# Altium PCB Nano_RP2040_Connect.PcbDoc (part 1 of 2)
Units mm, origin at the board's own origin, x right, y up, seen from the top; angles counter-clockwise.
Board outline 43.18 x 17.78 mm, 4 copper layers (TOP, GND, SIG, BOTTOM), stack 1.586 mm thick; 92 components, 78 nets, 388 pads, 198 vias.
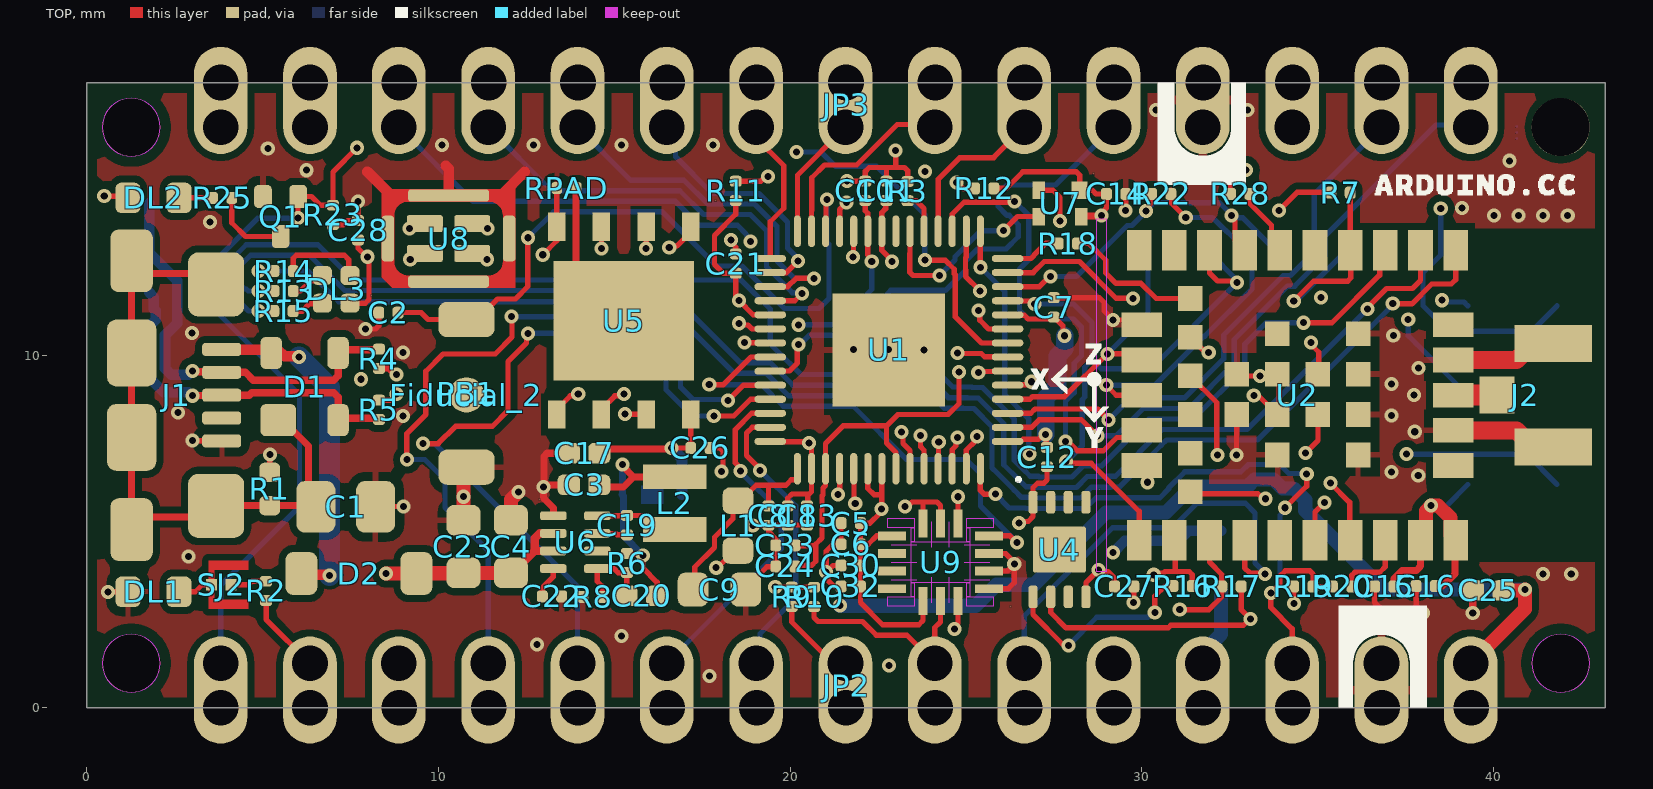
[diagram p0: TOP view]
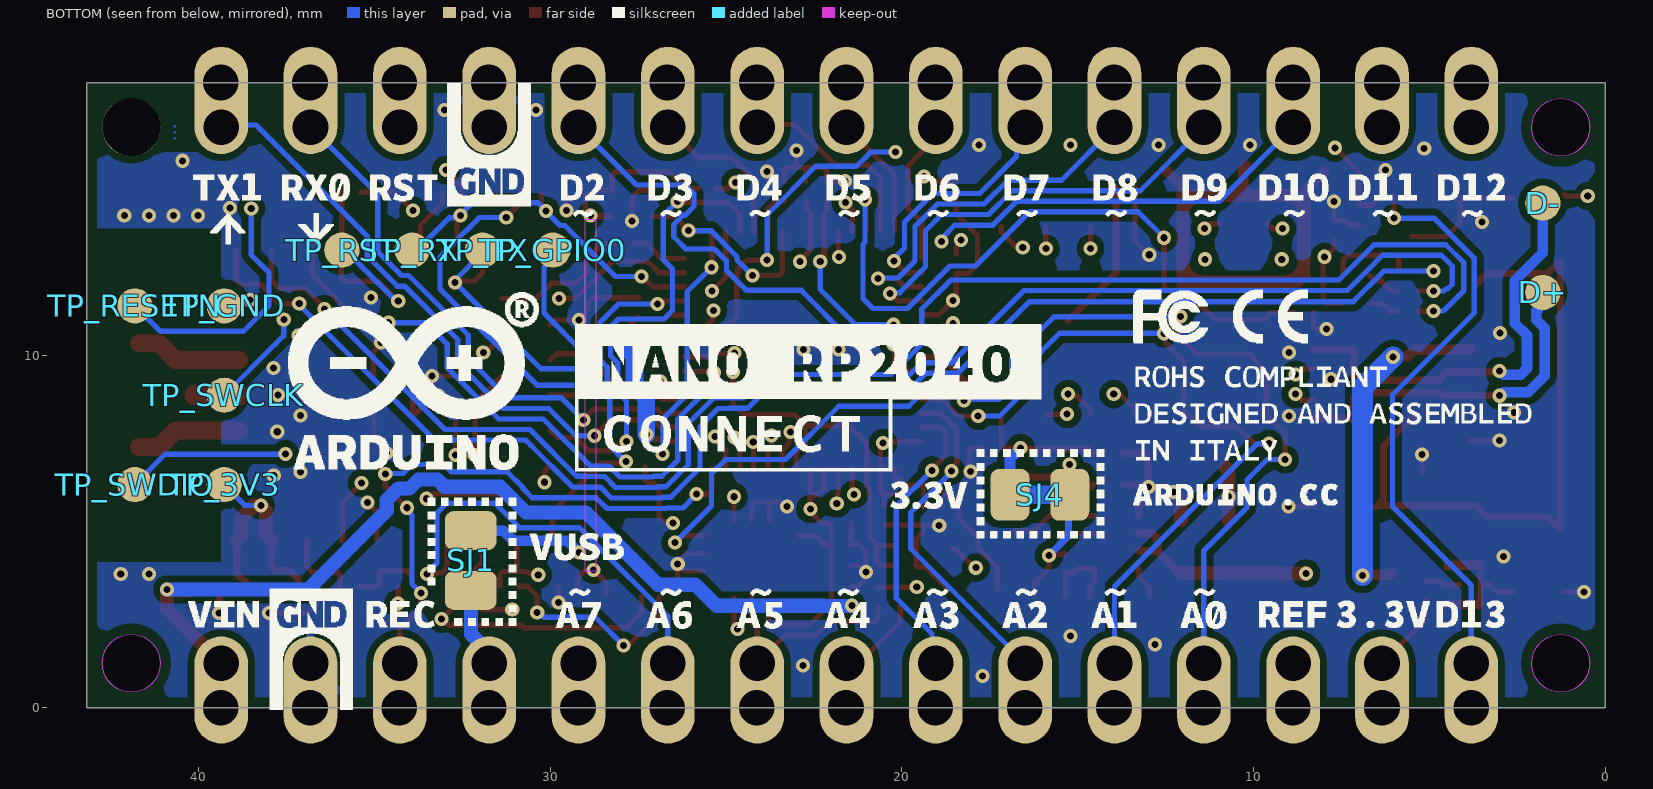
[diagram p1: BOTTOM view, seen from below]
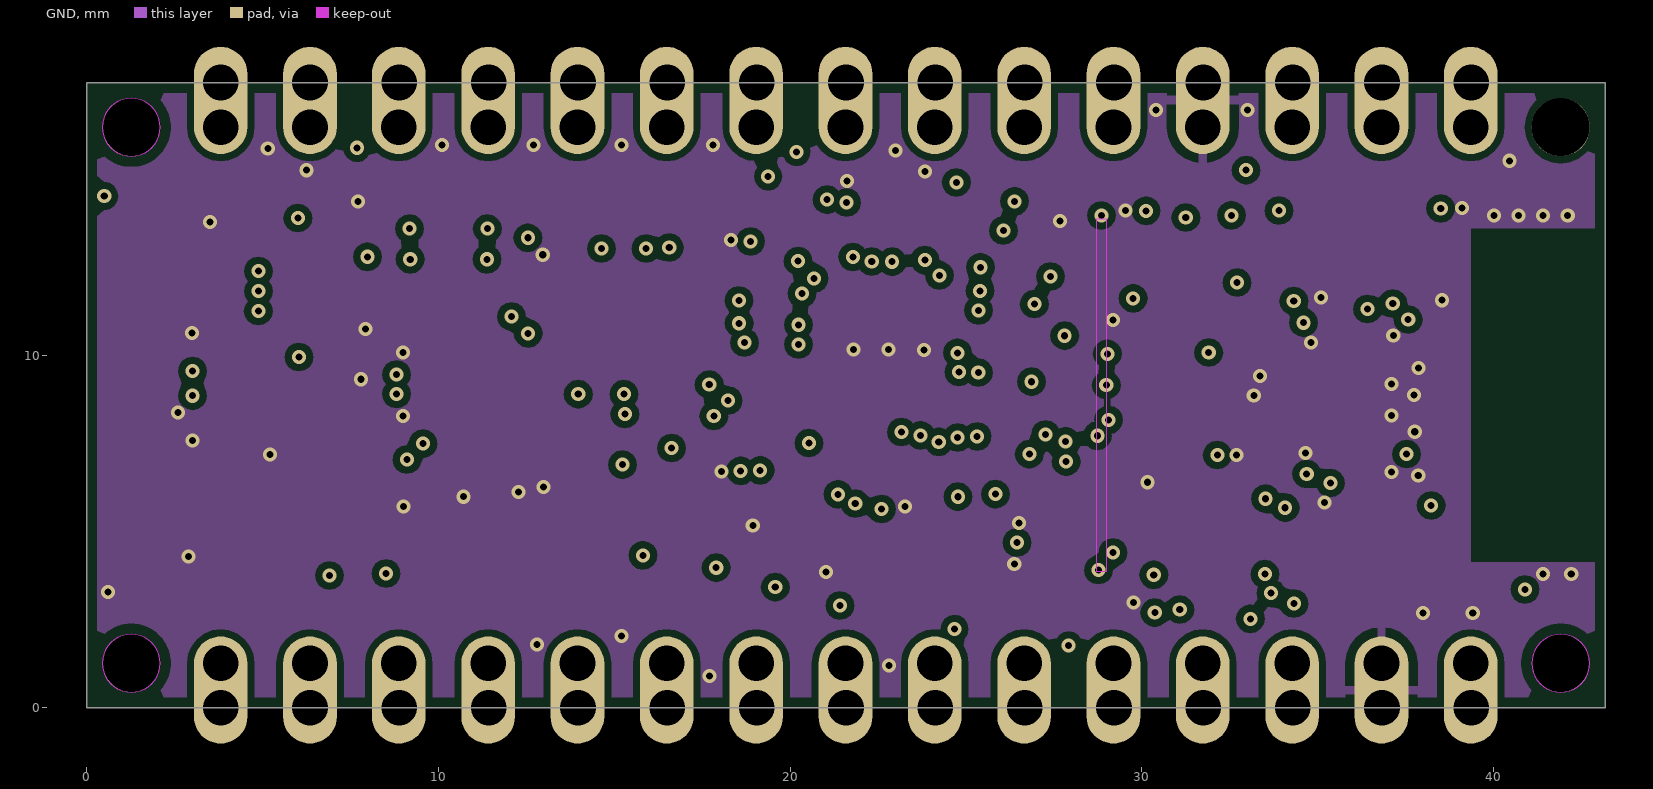
[diagram p2: GND]
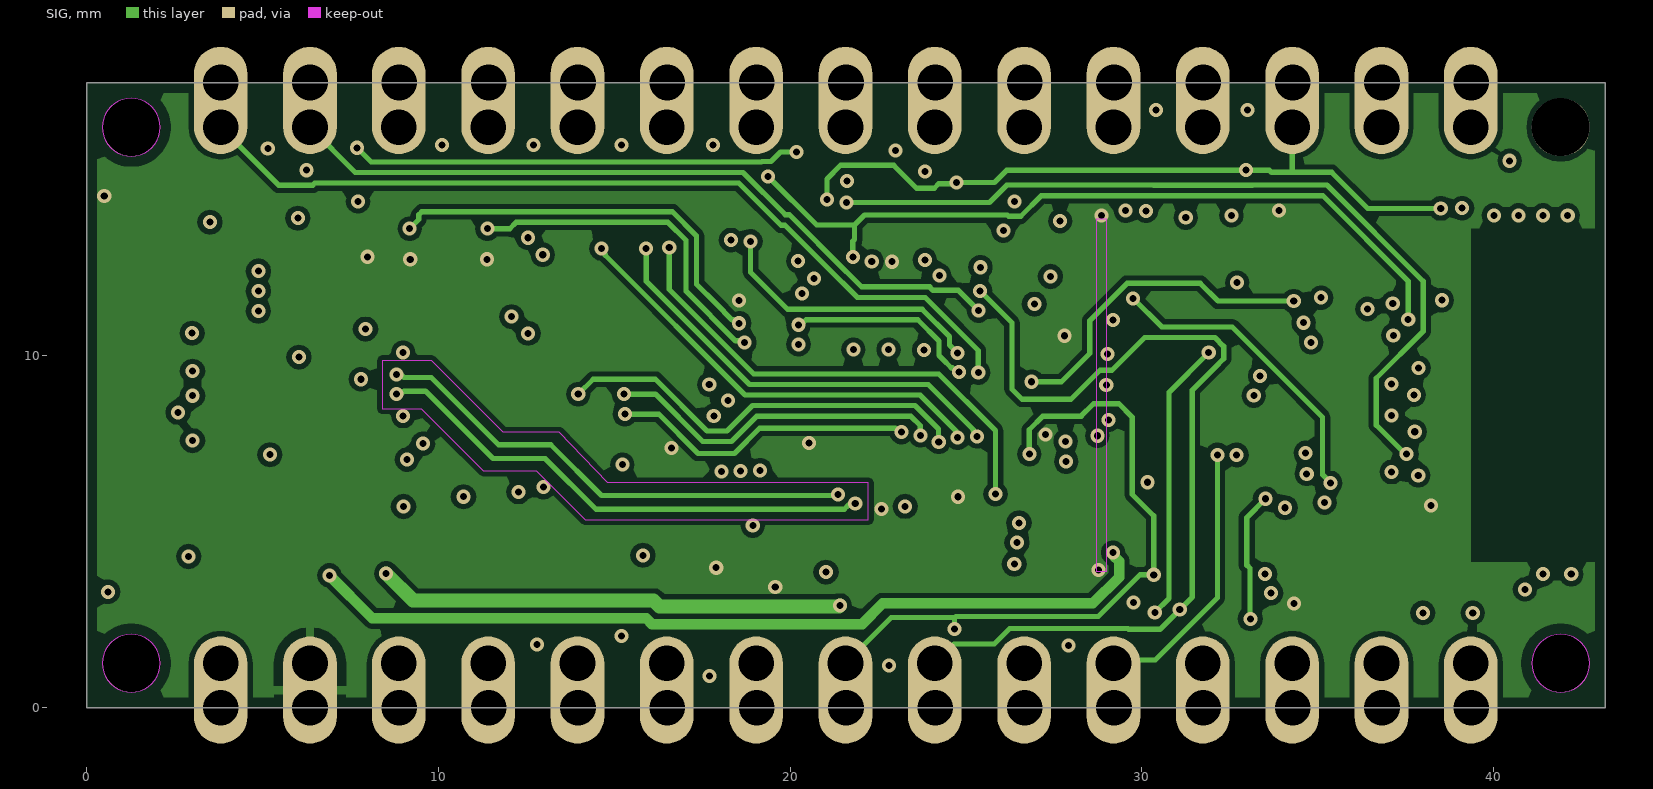
[diagram p3: SIG]
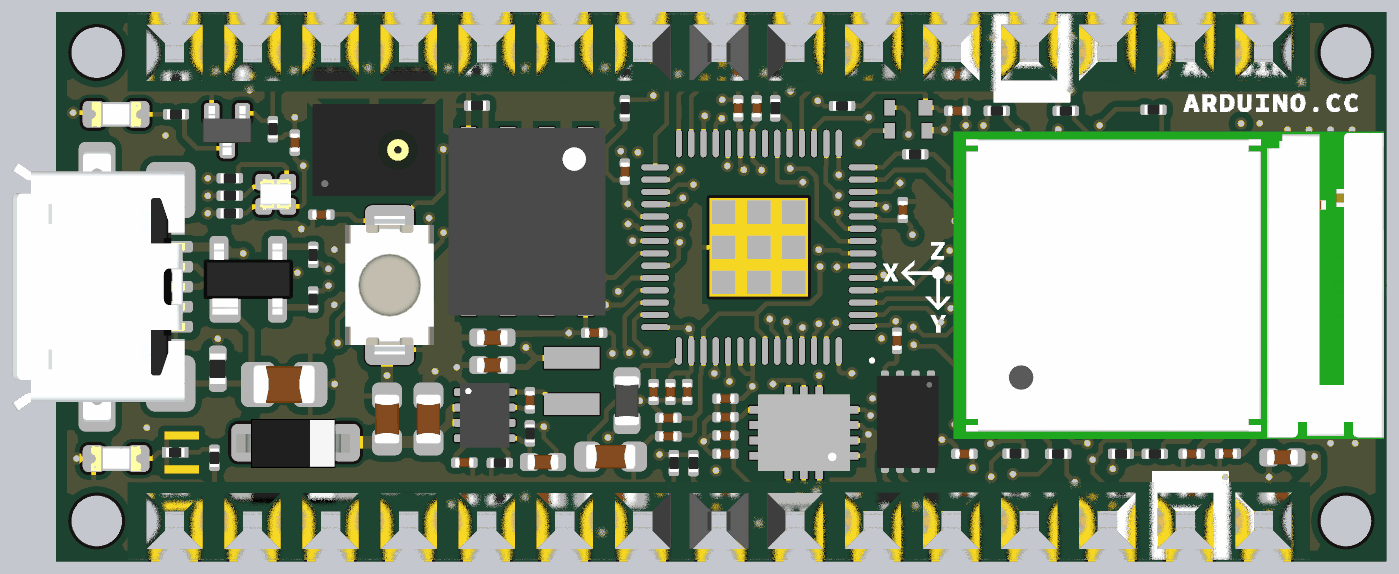
[diagram p5: 3D render of the assembled board from above, using the file's embedded part models]

## Layer stack, top to bottom
Top Solder: solder mask 0.0102, Solder Resist, Dk 3.5
TOP: signal copper 0.018
Dielectric 1: prepreg 0.14, PP-014, Dk 4.2
GND: signal copper 0.035
Dielectric2: core 1.2, FR-4, Dk 4.8
SIG: signal copper 0.035
Dielectric3: prepreg 0.14, PP-014, Dk 4.2
BOTTOM: signal copper 0.018
Bottom Solder: solder mask 0.0102, Solder Resist, Dk 3.5

## Board outline
43.174,-0.009 -0.006,-0.009 -0.006,17.771 43.174,17.771
cut-out: 41.904,0.436 ccw(c41.904,1.261) 42.73,1.261 ccw(c41.904,1.261) 41.904,2.087 ccw(c41.904,1.261) 41.079,1.261 ccw(c41.904,1.261)
cut-out: 1.264,15.676 ccw(c1.264,16.501) 2.09,16.501 ccw(c1.264,16.501) 1.264,17.327 ccw(c1.264,16.501) 0.439,16.501 ccw(c1.264,16.501)
cut-out: 1.264,0.436 ccw(c1.264,1.261) 2.09,1.261 ccw(c1.264,1.261) 1.264,2.087 ccw(c1.264,1.261) 0.439,1.261 ccw(c1.264,1.261)

## Design rules (kind name [scope] priority, off if disabled: settings)
BoardOutlineClearance Silks [(OnLayer('Top Overlay') OR OnLayer('Bottom Overlay'))] p1: gap=0.01 ignorepadtopadclearanceinfootprint=FALSE
BoardOutlineClearance MountingHoles [(ObjectKind = 'Pad') And (Name = 'Free-MH')] p2: gap=0 ignorepadtopadclearanceinfootprint=FALSE
BoardOutlineClearance Header_Castellated [((ObjectKind = 'Pad') And (Component = 'JP2')) OR                                                                                    ((ObjectKind = 'Pad') And (Component = 'JP3'))] p3: gap=0 ignorepadtopadclearanceinfootprint=FALSE
BoardOutlineClearance [All] p4: gap=0.3 ignorepadtopadclearanceinfootprint=FALSE
Clearance GND_POLYGONS [(InNamedPolygon('GND_TOP') OR InNamedPolygon('GND_2') OR InNamedPolygon('GND_3') OR InNamedPolygon('GND_BOT'))] p1: gap=0.2 ignorepadtopadclearanceinfootprint=FALSE
Clearance "Generic clearance 0.15mm" [All] p2: gap=0.15 ignorepadtopadclearanceinfootprint=FALSE
ComponentClearance NINA-UFL [InComponent('U2') vs InComponent('J2')] p1: gap=0 collisioncheckmode=3 verticalgap=0 showdistances=FALSE
ComponentClearance [All] p2: gap=0 collisioncheckmode=3 verticalgap=0 showdistances=FALSE
DiffPairsRouting [InDifferentialPairClass('USB')] p1: maxlimit=0.254 minlimit=0.15 mostfreqgap=0.254 toplayer_maxgap=0.15 toplayer_prefgap=0.15 toplayer_minwidth=0.15 toplayer_maxwidth=0.21 toplayer_prefwidth=0.21 midlayer14_mingap=0.24 midlayer14_maxgap=0.24 midlayer14_prefgap=0.24 midlayer14_minwidth=0.15 midlayer14_maxwidth=0.15 midlayer14_prefwidth=0.15 bottomlayer_maxgap=0.15 bottomlayer_prefgap=0.15 bottomlayer_minwidth=0.21 bottomlayer_maxwidth=0.21 bottomlayer_prefwidth=0.21 impedanceprofiledriven=TRUE impedanceprofileid={C5D8398E-BCA5-4495-8332-5063613C51E1} impedanceprofilevalue=90.000000 maxuncoupledlength=12.7
HoleSize [All] p1: absolutevalues=TRUE maxlimit=6 minlimit=0.2 maxpercent=80.000 minpercent=20.000
HoleToHoleClearance [All] p1: gap=0.25 allowstackedmicrovias=TRUE
MinimumAnnularRing [All] p1: minimumring=0.1
MinimumSolderMaskSliver [All] p1: minsoldermaskwidth=0.1
NetAntennae Inductor [(ObjectKind = 'Component') And (Comment = 'MAKK2016T3R3M')] p1: netantennaetolerance=10
NetAntennae [All] p2: netantennaetolerance=0
PolygonConnect [All] p1: thpad.connectstyle=Relief thpad.reliefconductorwidth=0.254 thpad.reliefentries=4 thpad.polygonreliefangle="90 Angle" thpad.airgapwidth=0.254 smdpad.connectstyle=Relief smdpad.reliefconductorwidth=0.15 smdpad.reliefentries=4 smdpad.polygonreliefangle="90 Angle" smdpad.airgapwidth=0.254 via.connectstyle=Direct via.reliefconductorwidth=0.254 via.reliefentries=4 via.polygonreliefangle="90 Angle" via.airgapwidth=0.254
RoomDefinition TOP [InComponentClass('TOP')] p1: confinementstyle=ConfineIn formatcopy=TRUE lockcomponents=FALSE outline -0.006,-0.009 43.174,-0.009 43.174,17.771 -0.006,17.771
RoutingVias [All] p1: holewidth=0.2 width=0.4 viastyle="Through Hole" minholewidth=0.2 minwidth=0.4 maxholewidth=0.2 maxwidth=0.4
ShortCircuit SJ4 [Component = 'SJ4' vs (InNet('+3V3') OR InNet('NetC3_2'))] p1: allowed=TRUE
ShortCircuit [All] p2: allowed=FALSE
SilkToSilkClearance [All] p1: silktosilkclearance=0.2
SilkToSolderMaskClearance [IsPad] p1: minsilkscreentomaskgap=0.1 clearancetoexposedcopper=TRUE
SolderMaskExpansion Solder_VIA [IsVia] p1: expansion=0.102 istentingtop=TRUE
SolderMaskExpansion [All] p2: expansion=0.102 istentingtop=FALSE
UnRoutedNet [All] p1: checkbadconnections=TRUE
ViasUnderSMD [All] p1: allowed=FALSE
Width [All] p1: maxlimit=5 minlimit=0.15 preferedwidth=0.15
20 further rules are at their usual default settings.

## Classes and differential pairs
net class 50ohm: ANT
differential pair class USB: D USB
pad class SMDPaste_OFF: D+-X D--X FD1-P$1 J3-4
differential pair USB: +USB_P -USB_N
differential pair D: +D_P -D_N

## Components (designator, comment, footprint, x,y, rotation, side; value= is the part's Value field where it differs from the comment)
C1 "C0805C472KDRACTU" CAP-0805 7.36,5.706 r180 top value=4.7nF
C2 "CL03A104KP3NNNC" CAP-0201 8.573,11.226 r180 top value=100nF
C3 "GRM155R60J106ME05D" CAP-0402 14.136,6.331 r0 top value=10µF
C4 "GRM188R61E106MA73J" CAP-0603 12.058,4.578 r270 top value=10µF
C5 "CL03A104KP3NNNC" CAP-0201 21.72,5.243 r180 top value=100nF
C6 "CL03A104KP3NNNC" CAP-0201 21.72,4.643 r180 top value=100nF
C7 "CL03A104KP3NNNC" CAP-0201 27.491,11.379 r90 top value=100nF
C8 "CL03A104KP3NNNC" CAP-0201 19.38,5.457 r270 top value=100nF
C9 "CC0603MRX5R5BB106" CAP-0603 17.985,3.355 r180 top value=10µF
C10 "CL03A104KP3NNNC" CAP-0201 22.134,14.691 r90 top value=100nF
C11 "CL03A104KP3NNNC" CAP-0201 22.734,14.691 r90 top value=100nF
C12 "CL03A104KP3NNNC" CAP-0201 27.299,7.122 r270 top value=100nF
C13 "GRM033R60J105MEA2D" CAP-0201 20.476,5.457 r270 top value=1µF
C14 "CL03A104KP3NNNC" CAP-0201 29.264,14.602 r0 top value=100nF
C15 "CL03A104KP3NNNC" CAP-0201 36.888,3.442 r180 top value=100nF
C16 "CL03A104KP3NNNC" CAP-0201 38.069,3.453 r180 top value=100nF
C17 "GRM155R60J106ME05D" CAP-0402 14.136,7.231 r0 top value=10µF
C18 "CL03A104KP3NNNC" CAP-0201 19.928,5.457 r270 top value=100nF
C19 "CL03A104KP3NNNC" CAP-0201 15.358,5.186 r270 top value=100nF
C20 "C0402C220J5GAC7411" CAP-0402 15.78,3.176 r0 top value=22pF
C21 "CL03A104KP3NNNC" CAP-0201 18.45,12.625 r90 top value=100nF
C22 "GRM033R60J105MEA2D" CAP-0201 13.225,3.16 r180 top value=1µF
C23 "GRM188R61E106MA73J" CAP-0603 10.708,4.578 r270 top value=10µF
C24 "CL03A104KP3NNNC" CAP-0201 19.862,4.014 r180 top value=100nF
C25 "C0402C105K8PACTU" CAP-0402 39.839,3.33 r0 top value=1µF
C26 "CL03A104KP3NNNC" CAP-0201 17.446,7.381 r0 top value=100nF
C27 "CL03A104KP3NNNC" CAP-0201 29.494,3.442 r0 top value=100nF
C28 "CL03A104KP3NNNC" CAP-0201 7.711,13.571 r90 top value=100nF
C30 "CL03A104KP3NNNC" CAP-0201 21.72,4.043 r180 top value=100nF
C32 "CL03A104KP3NNNC" CAP-0201 21.72,3.443 r180 top value=100nF
C33 "GRM033R60J105MEA2D" CAP-0201 19.862,4.614 r0 top value=1µF
D1 "PRTR5V0U2X,215" SOT190P230X110-4N 6.192,9.126 r0 top
D2 "D0026-A.2" SOD123-1 7.734,3.811 r180 top
D+ "CMP-018-0005-A.3" TP-1.00MM#1 1.772,11.802 r0 top
D- "CMP-018-0005-A.3" TP-1.00MM#1 1.772,14.342 r0 top
DL1 "HSMG-C190" LEDC1608X80N-AK 1.894,3.291 r0 top
DL2 "HSMD-C190" LEDC1608X80N-AK 1.894,14.491 r180 top
DL3 "SMLP34RGB2W3" SMLP34RGB2W 7.089,11.891 r90 top
Fiducial_2 "Fiducial mark 1mm with 2mm solder" "Fiducial mark 1mm with circle-Footprint-1" 10.794,8.891 r90 top
J1 "ZX62-AB-5PA(31)" ZX62-AB-5PA 1.274,8.881 r270 top
J2 "U.FL-R-SMT-1(60)" U.FL-R-SMT-1(60)-1 41.694,8.881 r270 top
JP2 "PINHD-1X15-NANO" PINHD-1X14_5VF#1 3.804,1.261 r180 top locked
JP3 "PINHD-1X15-NANO-DIGITAL-CASTELLATED" PINHD-1X14_5VF#2 39.364,16.501 r0 top locked
L1 "BLM18PG471SN1D" L-0603 18.514,5.173 r270 top
L2 "MAKK2016T3R3M" MAKK2016T3R3M-Footprint-1 16.718,5.814 r90 top
PB1 "IT-1185AP1C-160G-GTR" C&K_PTS820_NO_HOLES-1 10.794,8.933 r90 top
Q1 "2N7002T-7-F" SOT523 5.508,13.961 r180 top
R1 "CRCW04021M00FKED" RES-0402 5.201,6.214 r270 top value=1M
R2 "AC0201FR-07330RL" RES-0201 5.094,3.316 r270 top value=330
R3 "CRCW02010000Z0ED" RES-0201 23.338,14.687 r90 top value=0
R4 "CRCW020127R0FNED" RES-0201 8.304,9.916 r270 top value=27R
R5 "CRCW020127R0FNED" RES-0201 8.304,8.466 r90 top value=27R
R6 "RMCF0201FT976K" RES-0201 15.358,4.109 r90 top value=976k
R7 "AC0201FR-07220KL" RES-0201 35.644,14.639 r180 top value=220k
R8 "AC0201FR-07220KL" RES-0201 14.377,3.149 r0 top value=220k
R9 "RC0201FR-074K7L" RES-0201 20.043,3.147 r90 top value=4.7k
R10 "RC0201FR-074K7L" RES-0201 20.676,3.146 r90 top value=4.7k
R11 "RC0201FR-074K7L" RES-0201 18.45,14.691 r270 top value=4.7k
R12 "RC0201FR-074K7L" RES-0201 25.513,14.762 r0 top value=4.7k
R13 "AC0201FR-07330RL" RES-0201 5.594,11.841 r180 top value=330
R14 "AC0201FR-07330RL" RES-0201 5.594,12.412 r180 top value=330
R15 "AC0201FR-07330RL" RES-0201 5.591,11.271 r180 top value=330
R16 "CRCW02010000Z0ED" RES-0201 31.155,3.453 r180 top value=0
R17 "CRCW02010000Z0ED" RES-0201 32.544,3.442 r0 top value=0
R18 "CRCW02010000Z0ED" RES-0201 27.894,13.191 r0 top value=0
R19 "RC0201FR-074K7L" RES-0201 34.588,3.442 r180 top value=4.7k
R20 "CRCW02010000Z0ED" RES-0201 35.688,3.442 r180 top value=0
R22 "CRCW02010000Z0ED" RES-0201 30.546,14.602 r180 top value=0
R23 "RMCF0201FT976K" RES-0201 6.996,14.006 r90 top value=976k
R25 "AC0201FR-07330RL" RES-0201 3.844,14.491 r0 top value=330
R28 "CRCW02010000Z0ED" RES-0201 32.794,14.602 r180 top value=0
RPAD "CRCW02010000Z0ED" RES-0201 13.636,14.771 r180 top value=0
SJ1 "SMD solder JUMPER 0805" SJ#1 32.252,4.182 r270 bottom
SJ2 "Solder Jumper 0201 CLOSED with HUG" "Solder Jumper Maze-Footprint-1" 3.819,3.491 r270 top
SJ4 "SMD solder JUMPER CLOSED" SJ#2 16.071,6.052 r180 bottom
TP_3V3 "CMP-018-0005-A.3" TP-1.00MM#2 39.263,6.341 r90 bottom
TP_GND "CMP-018-0005-A.3" TP-1.00MM#2 39.263,11.421 r90 bottom
TP_GPIO0 "CMP-018-0005-A.3" TP-1.00MM#2 29.919,13.006 r90 bottom
TP_RESETN "CMP-018-0005-A.3" TP-1.00MM#2 41.803,11.421 r90 bottom
TP_RST "CMP-018-0005-A.3" TP-1.00MM#2 35.919,13.006 r90 bottom
TP_RX "CMP-018-0005-A.3" TP-1.00MM#2 33.919,13.006 r90 bottom
TP_SWCLK "CMP-018-0005-A.3" TP-1.00MM#2 39.263,8.881 r90 bottom
TP_SWDIO "CMP-018-0005-A.3" TP-1.00MM#2 41.803,6.341 r90 bottom
TP_TX "CMP-018-0005-A.3" TP-1.00MM#2 31.919,13.006 r90 bottom
U1 "RP2040" QFN40P700X700X90_HS-57N 22.804,10.166 r180 top locked
U2 "NINA-W102-00B" NINA-W102 34.869,8.881 r180 top locked
U4 "ATECC608A-MAHDA-T" UDFN8 27.654,4.491 r180 top
U5 "AT25SF128A-MHB-T" PSON127P600X60_HS-9N 15.266,11.001 r270 top
U6 "MP2322GQH" QFN50P150X200X90-8L 13.888,4.701 r0 top
U7 "DSC6111HI2B-012.0000" DFN120P120X89-4M 27.672,14.333 r180 top
U8 "MP34DT06JTR" HCLGA 10.284,13.334 r0 top
U9 "LSM6DSOXTR" VFLGA14 24.271,4.131 r180 top

## Footprints (in the part's own frame and the unit in brackets; to place one, negate y for a bottom-side part, rotate by r counter-clockwise, add the part's x,y. Pads: shape width x height; smd on the part's side, far side on the other; paste and mask are expansions set on the pad)
C&K_PTS820_NO_HOLES-1 [mm]
  rrect49% 1x1.6 smd mask+0.05: 1(-2.1,0) 2(2.1,0)
  body extent -2.25,-1.45 2.25,1.45, height 2
CAP-0201 [mm] "Chip Capacitor, 2-Leads, Body 0201 (in) 0603 (mm) IPC Medium Density"
  rrect52% 0.31x0.34 smd mask+0: 1(-0.275,0) 2(0.275,0)
  body extent -0.3,-0.15 0.3,0.15, height 0.3
CAP-0402 [mm] "Chip Capacitor, 2-Leads, Body  0402 (in) 1005 (mm), IPC Medium Density"
  rrect52% 0.63x0.58 smd mask+0: 1(-0.435,0) 2(0.435,0)
  body extent -0.5,-0.25 0.5,0.25, height 0.5
CAP-0603 [mm] "Chip Capacitor, Body 0603 imperial,1.6x0.8mm, IPC High Density"
  rrect51% 0.87x0.97 smd mask+0: 1(-0.75,0) 2(0.75,0)
  body extent -0.8,-0.4 0.8,0.4, height 0.8
CAP-0805 [mm] "Chip Capacitor, Body 0805 imperial, 2.0x1.2mm, IPC Medium Density"
  rrect45% 1.11x1.47 smd mask+0: 1(-0.85,0) 2(0.85,0)
  body extent -1,-0.62 1,0.63, height 1.25
DFN120P120X89-4M [mm] "DFN, 4-Leads, Body 1,60x1,20mm, Pitch 1,20mm, IPC Low Density"
  rect 0.45x0.5 smd mask+0.04: 1(-0.555,-0.375)
  rect 0.35x0.5 smd mask+0.04: 2(0.605,-0.375) 3(0.605,0.375) 4(-0.605,0.375)
  body extent -0.8,-0.6 0.8,0.6, height 0.9
"Fiducial mark 1mm with circle-Footprint-1" [mm]
  round 1 smd paste-10 mask+0.5: 1(0,0)
  TOP pour cut-out: 0,1 0.383,0.924 0.707,0.707 0.924,0.383 1,0 1,0 0.924,-0.383 0.707,-0.707 0.383,-0.924 0,-1 0,-1 -0.383,-0.924 -0.707,-0.707 -0.924,-0.383 -1,0 -1,0 -0.924,0.383 -0.707,0.707 -0.383,0.924 0,1
HCLGA [mm]
  rrect22% 1.02x0.48 smd paste+0 mask+0: 1(-0.675,-0.425) 2(0.675,-0.425) 3(0.675,0.425) 4(-0.675,0.425)
  rrect50% 0.35x1.3 smd paste+0 mask+0: 5(-1.725,0) 5(1.725,0)
  rrect50% 2.3x0.35 smd paste+0 mask+0: 5(0,-1.225) 5(0,1.225)
  TOP region: 1.9,0 1.9,1.4 -1.9,1.4 -1.9,-1.1 -1.6,-1.4 1.9,-1.4 1.9,0 1.55,0 1.55,-0.65 1.52,-0.803 1.433,-0.933 1.303,-1.02 1.15,-1.05 1.15,-1.05 -1.15,-1.05 -1.303,-1.02 -1.433,-0.933 -1.52,-0.803 -1.55,-0.65 -1.55,-0.65 -1.55,0.65 -1.52,0.803 -1.433,0.933 -1.303,1.02 -1.15,1.05 -1.15,1.05 1.15,1.05 1.303,1.02 1.433,0.933 1.52,0.803 1.55,0.65 1.55,0.65 1.55,0
  body extent -2,-1.5 2,1.5, height 1
L-0603 [mm] "Chip Inductor - Body 0603 imperial,1.6x0.8mm, IPC High Density"
  rrect51% 0.75x0.87 smd mask+0: 1(-0.71,0) 2(0.71,0)
  body extent -0.8,-0.4 0.8,0.4, height 0.8
LEDC1608X80N-AK [mm]
  rrect50% 0.72x0.87 smd: A(0.725,0) C(-0.725,0)
  body extent -0.8,-0.4 0.8,0.4, height 0.79
MAKK2016T3R3M-Footprint-1 [mm]
  rect 0.7x1.8 smd mask+0.05: 1(-0.75,0) 2(0.75,0)
  body extent -1,-0.8 1,0.8, height 1
NINA-W102 [mm]
  rect 0.7x1.15 smd mask+0.05: 1(4.95,4.125) 2(3.95,4.125) 3(2.95,4.125) 4(1.95,4.125) 5(0.95,4.125) 6(-0.05,4.125) 7(-1.05,4.125) 8(-2.05,4.125) 9(-3.05,4.125) 10(-4.05,4.125) 16(-4.05,-4.125) 17(-3.05,-4.125) 18(-2.05,-4.125) 19(-1.05,-4.125) 20(-0.05,-4.125) 21(0.95,-4.125) 22(1.95,-4.125) 23(2.95,-4.125) 24(3.95,-4.125) 25(4.95,-4.125)
  rect 1.15x0.7 smd mask+0.05: 11(-3.975,2) 12(-3.975,1) 13(-3.975,0) 14(-3.975,-1) 15(-3.975,-2) 26(4.875,-2) 27(4.875,-1) 28(4.875,0) 29(4.875,1) 30(4.875,2)
  rect 0.7x0.7 smd mask+0.05: 31(3.5,2.75) 32(3.5,1.65) 33(3.5,0.55) 34(3.5,-0.55) 35(3.5,-1.65) 36(3.5,-2.75) GND1(-1.28,1.7) GND2(-1.28,0.55) GND3(-1.28,-0.6) GND4(-1.28,-1.75) GND5(-0.13,0.55) GND6(-0.13,-0.6) GND7(1.02,1.7) GND8(1.02,0.55) GND9(1.02,-0.6) GND10(1.02,-1.75) GND11(2.17,0.55) GND12(2.17,-0.6)
  Keep-Out Layer region: 5.865,-5 6.165,-5 6.165,5 5.865,5
  body extent -8.27,-5.05 5.73,4.95, height 3.81
PINHD-1X14_5VF#1 [mil]
  round 27.56 hole 40 mask+7.87: 1(0,50) 2(-100,50) 3(-200,50) 4(-300,50) 5(-400,50) 6(-500,50) 7(-600,50) 8(-700,50) 9(-800,50) 10(-900,50) 11(-1000,50) 12(-1100,50) 13(-1200,50) 14(-1300,50) 15(-1400,50)
  oval 60x120 hole 40 copper offset 0,30 paste-100: 1(0,0) 2(-100,0) 3(-199.41,0) 4(-299.41,0) 5(-399.41,0) 6(-499.41,0) 7(-599.41,0) 8(-699.41,0) 9(-799.41,0) 10(-899.41,0) 11(-999.41,0) 12(-1099.41,0) 13(-1199.41,0) 14(-1299.41,0) 15(-1399.41,0)
  body extent -1454,-50 60,50, height 335
PINHD-1X14_5VF#2 [mil]
  oval 60x120 hole 40 copper offset 0,30 paste-100: 1(-0.59,0) 2(-100.59,0) 3(-200.59,0) 4(-300.59,0) 5(-400.59,0) 6(-500.59,0) 7(-600.59,0) 8(-700.59,0) 9(-800.59,0) 10(-900.59,0) 11(-1000.59,0) 12(-1100.59,0) 13(-1200.59,0) 14(-1300,0) 15(-1400,0)
  round 27.56 hole 40 mask+7.87: 1(0,50) 2(-100,50) 3(-200,50) 4(-300,50) 5(-400,50) 6(-500,50) 7(-600,50) 8(-700,50) 9(-800,50) 10(-900,50) 11(-1000,50) 12(-1100,50) 13(-1200,50) 14(-1300,50) 15(-1400,50)
  body extent -1460,-50 54,50, height 335
PSON127P600X60_HS-9N [mm] "PSON, 8-Leads, Body 5,00x6,00mm, Pitch 1,27mm, Thermal Pad 4,00x3,40mm, IPC Medium Density"
  rect 0.8x0.5 smd mask+0.05: 1(-2.67,1.905) 2(-2.67,0.635) 3(-2.67,-0.635) 4(-2.67,-1.905) 5(2.67,-1.905) 6(2.67,-0.635) 7(2.67,0.635) 8(2.67,1.905)
  rect 3.4x4 smd paste-10 mask+0.05: 9(0,0)
  body extent -3.05,-2.55 3.05,2.55, height 0.6
QFN40P700X700X90_HS-57N [mm] "QFN, 56-Leads, Body 7,00x7,00mm, Pitch 0,40mm, Thermal Pad 3,10x3,10mm, IPC Medium Density"
  oval 0.9x0.2 smd mask+0.03: 1(-3.375,2.6) 2(-3.375,2.2) 3(-3.375,1.8) 4(-3.375,1.4) 5(-3.375,1) 6(-3.375,0.6) 7(-3.375,0.2) 8(-3.375,-0.2) 9(-3.375,-0.6) 10(-3.375,-1) 11(-3.375,-1.4) 12(-3.375,-1.8) 13(-3.375,-2.2) 14(-3.375,-2.6) 29(3.375,-2.6) 30(3.375,-2.2) 31(3.375,-1.8) 32(3.375,-1.4) 33(3.375,-1) 34(3.375,-0.6) 35(3.375,-0.2) 36(3.375,0.2) 37(3.375,0.6) 38(3.375,1) 39(3.375,1.4) 40(3.375,1.8) 41(3.375,2.2) 42(3.375,2.6)
  oval 0.2x0.9 smd mask+0.03: 15(-2.6,-3.375) 16(-2.2,-3.375) 17(-1.8,-3.375) 18(-1.4,-3.375) 19(-1,-3.375) 20(-0.6,-3.375) 21(-0.2,-3.375) 22(0.2,-3.375) 23(0.6,-3.375) 24(1,-3.375) 25(1.4,-3.375) 26(1.8,-3.375) 27(2.2,-3.375) 28(2.6,-3.375) 43(2.6,3.375) 44(2.2,3.375) 45(1.8,3.375) 46(1.4,3.375) 47(1,3.375) 48(0.6,3.375) 49(0.2,3.375) 50(-0.2,3.375) 51(-0.6,3.375) 52(-1,3.375) 53(-1.4,3.375) 54(-1.8,3.375) 55(-2.2,3.375) 56(-2.6,3.375)
  rect 3.2x3.2 smd paste-5: 57(0,0)
  silkscreen extent -3.73,3.63 -3.63,3.73, body extent -3.5,-3.5 3.5,3.5, height 0.9
QFN50P150X200X90-8L [mm] "QFN, 8-Leads, Body 1,50x2,00mm, Pitch 0,50mm, IPC High Density"
  rrect50% 0.75x0.25 smd mask+0.05: 1(-0.625,0.75) 2(-0.625,0.25) 3(-0.625,-0.25) 4(-0.625,-0.75) 5(0.625,-0.75) 6(0.625,-0.25) 7(0.625,0.25) 8(0.625,0.75)
  body extent -0.8,-1.05 0.8,1.05, height 0.9
RES-0201 [mm] "Chip Resistor, 2-Leads, Body 0201 (in) 0603 (mm) IPC Medium Density"
  rrect52% 0.31x0.34 smd mask+0: 1(-0.275,0) 2(0.275,0)
  body extent -0.3,-0.15 0.3,0.15, height 0.24
RES-0402 [mm] "Chip Resistor, 2-Leads, Body  0402 (in) 1005 (mm), IPC Medium Density"
  rrect51% 0.55x0.58 smd mask+0: 1(-0.475,0) 2(0.475,0)
  body extent -0.5,-0.25 0.5,0.25, height 0.34
SJ#1 [mm]
  rrect45% 1.11x1.47 smd: 1(-0.85,0) 2(0.85,0)
SJ#2 [mm]
  rrect45% 1.11x1.47 smd mask+0: 1(-0.85,0) 2(0.85,0)
  TOP region: -0.31,0.254 -0.31,-0.254 0.31,-0.254 0.31,0.254
SMLP34RGB2W [mm]
  rrect52% 0.54x0.54 smd: 1(-0.395,-0.395) 2(-0.395,0.395) 3(0.395,0.395) 4(0.395,-0.395)
  body extent -0.5,-0.5 0.5,0.5, height 0.2
SOD123-1 [mm]
  rrect50% 0.91x1.22 smd: A(1.635,0) C(-1.635,0)
  body extent -1.78,-0.78 1.92,0.82, height 1.27
"Solder Jumper Maze-Footprint-1" [mm]
  rect 0.34x0.31 smd mask+0: 1(0,-0.275) 2(0,0.275)
  TOP region: -0.424,0.77 -0.424,-0.2 0.424,-0.2 0.424,0.77 0.678,0.77 0.678,-0.35 -0.678,-0.35 -0.678,0.77
  body extent -0.15,-0.3 0.15,0.3, height 0.24
SOT190P230X110-4N [mm]
  rrect33% 1.01x0.91 smd paste+0 mask+0: 1(-0.75,-0.955)
  rrect49% 0.61x0.91 smd paste+0 mask+0: 2(0.95,-0.955) 3(0.95,0.955) 4(-0.95,0.955)
  body extent -1.45,-1.15 1.45,1.15, height 1
SOT523 [mm]
  rrect50% 0.5x0.66 smd: D(0,0.57) G(-0.5,-0.57) S(0.5,-0.57)
  body extent -0.8,-0.8 0.8,0.8, height 0.8
TP-1.00MM#1 [mm]
  rrect100% 1x1 smd far side paste-2.54: X(0,0)
TP-1.00MM#2 [mm]
  rrect100% 1x1 smd paste-2.54: X(0,0)
U.FL-R-SMT-1(60)-1 [mm]
  rect 1.05x2.2 smd paste-3: GND(-1.475,0) GND(1.475,0)
  rect 1.05x1 smd paste-3: SIG(0,-1.6)
  body extent -1.5,-1.55 1.5,1.55, height 1.25
UDFN8 [mm] "QFN, 8-Leads, Body 3.00x2.00mm, Pitch 0.50mm, Thermal Pad 1.30x1.50mm, IPC Medium Density"
  rrect54% 0.26x0.64 smd paste+0 mask+0: 1(-0.75,-1.345) 2(-0.25,-1.345) 3(0.25,-1.345) 4(0.75,-1.345) 5(0.75,1.345) 6(0.25,1.345) 7(-0.25,1.345) 8(-0.75,1.345)
  rrect8% 1.5x1.3 smd paste-1.5 mask+0: 9(0,0)
  body extent -1,-1.5 1,1.5, height 0.55
VFLGA14 [mm]
  rect 0.8x0.25 smd mask+0.05: 1(-1.375,0.75) 2(-1.375,0.25) 3(-1.375,-0.25) 4(-1.375,-0.75) 8(1.375,-0.75) 9(1.375,-0.25) 10(1.375,0.25) 11(1.375,0.75)
  rect 0.25x0.8 smd mask+0.05: 5(-0.5,-1.1) 6(0,-1.1) 7(0.5,-1.1) 12(0.5,1.1) 13(0,1.1) 14(-0.5,1.1)
  TOP keep-out region: -0.83,-0.98 -0.83,-0.58 -0.74,-0.58 -0.74,-0.98
  TOP keep-out region: 0.74,-0.98 0.74,-0.58 0.83,-0.58 0.83,-0.98
  TOP keep-out region: 0.74,0.58 0.74,0.98 0.83,0.98 0.83,0.58
  TOP keep-out region: -0.83,0.58 -0.83,0.98 -0.74,0.98 -0.74,0.58
  TOP keep-out region: -1.5,-1.25 -1.5,-0.98 -0.74,-0.98 -0.74,-1.25
  TOP keep-out region: 0.74,-1.25 0.74,-0.98 1.5,-0.98 1.5,-1.25
  TOP keep-out region: 0.74,0.98 0.74,1.25 1.5,1.25 1.5,0.98
  TOP keep-out region: -1.5,0.98 -1.5,1.25 -0.74,1.25 -0.74,0.98
  TOP keep-out region: -0.83,-0.58 -0.83,0.58 0.83,0.58 0.83,-0.58
  TOP keep-out lines w0.01: 1.4,0.5 0.67,0.5 ; 1.4,0 0.67,0 ; 1.4,-0.5 0.67,-0.5 ; 0.25,1.15 0.25,0.42 ; 0.25,-0.42 0.25,-1.15 ; -0.25,1.15 -0.25,0.42 ; -0.25,-0.42 -0.25,-1.15 ; -0.67,0.5 -1.4,0.5 ; -0.67,0 -1.4,0 ; -0.67,-0.5 -1.4,-0.5
  body extent -1.5,-1.25 1.5,1.25, height 0.76
ZX62-AB-5PA [mm]
  rrect49% 0.37x1.11 smd paste+0 mask+0: 1(-1.3,2.56) 2(-0.65,2.56) 3(0,2.56) 4(0.65,2.56) 5(1.3,2.56)
  rrect37% 1.825x1.6 smd paste+0 mask+0: M1(-3.147,2.4) M4(3.147,2.4)
  rrect37% 1.78x1.2 smd paste+0 mask+0: M2(-3.82,0) M3(3.82,0)
  rrect37% 1.9x1.4 smd paste+0 mask+0: M5(-1.2,0) M6(1.2,0)
  body extent -4.4,-2.75 4.4,2.85, height 2.75

## Part data
C1: library part C0059-A.9, "CAP CHIP 0805 4.7nF 1000V X7R 10%", Case Code (Imperial)=0805, Case Code (Metric)=2012, Dielectric=X7R, Manufacturer=KEMET, Tolerance=10%, Voltage=1kV, Case/Package=0805, Code Arduino=0689, Package=0805, Part Number=C0805C472KDRACTU
C2 C5 C6 C7 C8 C10 C11 C12 C14 C15 C16 C18 C19 C21 C24 C26 C27 C28 C30 C32: library part C0113-A.1, "CAP CHIP 0201 100nF 10V X5R 10%", Case Code (Imperial)=0201, Case Code (Metric)=0603, Dielectric=X5R, Manufacturer="Samsung Electro-Mechanics", Tolerance=10%, Voltage=10V, Case/Package=0201, Code Arduino=C0113, Package=0201, Part Number=CL03A104KP3NNNC
C3 C17: library part C0091-A.8, "CAP CHIP 0402 10UF X5R 6.3V 20%", Case Code (Imperial)=0402, Case Code (Metric)=1005, Dielectric=X5R, Manufacturer=Murata, Tolerance=20%, Voltage=6.3V, Case/Package=0402, Code Arduino=C0091, Package=0402, Part Number=GRM155R60J106ME05D
C4 C23: library part C0047-A.12, "CAP CHIP 0603 10uF 25V X5R 20%", Case Code (Imperial)=0603, Case Code (Metric)=1608, Dielectric=X5R, Manufacturer=Murata, Manufacturer 2=Samsung, Manufacturer Part Number 2=CL10A226MPCNUBE, Part Number=C1608X5R1A226MT000N, Tolerance=20%, Voltage=25V, Case/Package=0603, Code Arduino=2213, Package=0603
C9: library part C0046-A.9, "CAP CHIP 0603 10uF 6V3 X5R 20% Bob", Case Code (Imperial)=0603, Case Code (Metric)=1608, Dielectric=X5R, Manufacturer=Yageo, Tolerance=20%, Voltage=6.3V, Case/Package=0603, Code Arduino=A5193, Package=0603, Part Number=CC0603MRX5R5BB106
C13 C22 C33: library part C0002-A.9, "CAP CHIP 0201 1UF 6.3V X5R 20%", Case Code (Imperial)=0201, Case Code (Metric)=0603, Dielectric=X5R, Manufacturer=Murata, Tolerance=20%, Voltage=6.3V, Case/Package=0201, Code Arduino=A5520, Package=0201, Part Number=GRM033R60J105MEA2D
C20: library part C0029-A.9, "CAP CHIP 0402 22pF 50V C0G 5%", Case Code (Imperial)=0402, Case Code (Metric)=1005, Dielectric=C0G, Manufacturer=KEMET, Manufacturer 2=AVX, Manufacturer Part Number 2=04025A220JAT2A, Tolerance=5%, Voltage=50V, Case/Package=0402, Code Arduino=0137, Package=0402, Part Number=C0402C220J5GAC7411
C25: library part C0017-A.9, "CAP CHIP 0402 1uF 10V X5R 10%", Case Code (Imperial)=0402, Case Code (Metric)=1005, Dielectric=X5R, Manufacturer=KEMET, Manufacturer 2=AVX, Manufacturer Part Number 2=GRM155R61A105KE15D, Tolerance=10%, Voltage=10V, Case/Package=0402, Code Arduino=0133, Package=0402, Part Number=C0402C105K8PACTU
D1: library part D0025-A.3, "TVS ARRAY 4LIN.8kV 1pF SOT143B", Manufacturer=Nexperia, Code Arduino=2209, Device Type="ESD protection", Part Number=PRTR5V0U2X,215
D2: "DIODE SCHOTTKY SMD 1A 40V SOD123FL", Manufacturer=Nexperia, Part Number=PMEG6020AELRX, Code Arduino=2208, Device Type="Diode Schottky", RoHS Compliance=RoHS3
D+ D- TP_3V3 TP_GND TP_GPIO0 TP_RESETN TP_RST TP_RX TP_SWCLK TP_SWDIO TP_TX: library part UT0013-A.2, "Test point 1.00mm", Design Item ID=CMP-018-0005-A.3, Pin Count=1, Source=ut.SchLib
DL1: library part L0009-A.4, "LED SMD 0603 GREEN/568 15mcd 120^", Manufacturer=Broadcom, Code Arduino=2204, Part Number=HSMG-C190, Pin Count=2
DL2: library part L0007-A.4, "LED SMD 0603 ORANGE604 8mcd DIFF.", Manufacturer=Broadcom, Code Arduino=2245, Part Number=HSMD-C190, Pin Count=2
DL3: library part L0014-A.5, "LED RGB DIFFUSED PICOLED SMD", Case Code (Imperial)=0404, Case Code (Metric)=1010, Color=Blue,Green,Red, Forward Current=20mA, Forward Voltage=3V, Lens Color=White, Manufacturer="ROHM Semiconductor", Max Operating Temperature=85°C, Min Operating Temperature=-40°C, Package Quantity=1, Test Current=5mA, Case/Package=0404, Code Arduino=A5469, Dominant Wavelength=470nm, Height=0.25mm, Lead Free="Lead Free", Length=1mm, Lens Style=Rectangular, Lens Transparency=Diffused, Luminous Intensity=45mcd, Mount="Surface Mount", Number of Pins=4, Packaging="Tape and Reel", Part Number=SMLP34RGB2W3, Pin Count=4, REACH SVHC=Unknown, Width=1mm
Fiducial_2: library part UT0024-A.6
J1: library part J0039-A.5, "CONN USB MICRO F/90^ SMD TipoAB 5x1", Manufacturer=Hirose, Code Arduino=2219, Part Number=ZX62-AB-5PA(31)
J2: library part J0042-A.4, "CONN Micro UFL NO PASTE", Manufacturer=Hirose, Code Arduino=A5364, Part Number=U.FL-R-SMT-1(60), Pin Count=3
JP2: library part J0055-A.4, "CONN THD SOCKET F/1/D 15V JANALOG NANO-TYPE", Code Arduino=A5563, Pin Count=15
JP3: library part J0183-A.1, "CONN THD SOCKET F/1/D 15V JDIGITAL NANO-TYPE CASTELLATED", Code Arduino=A5564, Pin Count=15
L1: library part I0006-A.3, "FERRITE SMD 0603 470R 1A 0.2R", Case Code (Imperial)=0603, Case Code (Metric)=1608, Current=1A, DC Resistance (DCR)=200mR, Manufacturer=Murata, Max Operating Temperature=125°C, Min Operating Temperature=-55°C, Package Quantity=1, Test Frequency=100MHz, Tolerance=25%, Code Arduino=2200, Device Type=Ferrite, Impedance=470µH, Max DC Current=1A, Packaging="Tape and Reel", Part Number=BLM18PG471SN1D
L2: library part I0045-A.6, "IND CHIP 0806 3.3 uH 20% 1.2A", Case Code (Imperial)=0806, Case Code (Metric)=2016, Current Rating=1.2A, DC Resistance (DCR)=255mR, Inductance=3.3uH, Manufacturer="Taiyo Yuden", Manufacturer 2=Murata, Manufacturer Part Number 2=LQM2MPN3R3NG0L, Max DC Current=1.15A, Max Operating Temperature=105°C, Min Operating Temperature=-40°C, Package Quantity=3000, Resistor Type=Wirewound, Test Frequency=2MHz, Tolerance=20%, Case/Package=0806, Code Arduino=I0045, Core Material=Metal, Halogen Free="Halogen Free", Height=1mm, Height - Seated (Max)=0.039inch, Length=0.079inch, Mount="Surface Mount", Packaging="Tape and Reel", Part Number=MAKK2016T3R3M, Saturation Current=1.15A, Shielding=Shielded, Termination=SMD/SMT, Width=1.6mm
PB1: library part B0001-A.7, "PUSHBUTTON WHITE NO ANCHORS", Color=White, Manufacturer=Switronic, Code Arduino=0173, Mount=SMT, Part Number=IT-1185AP1C-160G-GTR
Q1: library part T0003-A.2, "MOSFET N-CH 60V 115mA SOT523", Manufacturer="Diodes Inc.", Code Arduino=2368, Device Type="Mosfet N-CH SMD", Part Number=2N7002T-7-F, Pin Count=3
R1: library part R0058-A.5, "RES CHIP 0402 1M 1% 1/16W", Case Code (Imperial)=0402, Case Code (Metric)=1005, Manufacturer=Vishay, Manufacturer 2=Panasonic, Manufacturer Part Number 2=ERJ-2RKF1004X, Power=63mW, Tolerance=1%, Case/Package=0402, Code Arduino=0139, Package=0402, Part Number=CRCW04021M00FKED
R2 R13 R14 R15 R25: library part R0149-A.4, "RES CHIP 0201 330R 1% 1/20W", Case Code (Imperial)=0201, Case Code (Metric)=0603, Manufacturer=Yageo, Manufacturer 2="Samsung Electro-Mechanics", Manufacturer Part Number 2=RC0603F331CS, Power=50mW, Tolerance=1%, Case/Package=0201, Code Arduino=R0149, Part Number=AC0201FR-07330RL
R3 R16 R17 R18 R20 R22 R28 RPAD: library part R0140-A.4, "RES CHIP 0201 0R 1/20W 5%", Case Code (Imperial)=0201, Case Code (Metric)=0603, Manufacturer=Vishay, Power=50mW, Tolerance=5%, Case/Package=0201, Code Arduino=R0140, Length=0.6mm, Part Number=CRCW02010000Z0ED
R4 R5: library part R0197-A.2, "RES CHIP 0201 27R 1/20W 5%", Case Code (Imperial)=0201, Case Code (Metric)=0603, Manufacturer=Vishay, Manufacturer 2=Panasonic, Manufacturer Part Number 2=ERJ-U01F27R0C, Power=50mW, Tolerance=1%, Case/Package=0201, Code Arduino=R0197, Length=0.6mm, Part Number=CRCW020127R0FNED
R6 R23: library part R0198-A.1, "RES CHIP 0201 976k 1/20W 1%", Manufacturer="Stackpole Electronics Inc", Tolerance=1%, Code Arduino=R0198, Part Number=RMCF0201FT976K
R7 R8: library part R0199-A.1, "RES CHIP 0201 220k 1% 1/20W", Manufacturer=Yageo, Tolerance=1%, Code Arduino=R0199, Part Number=AC0201FR-07220KL
R9 R10 R11 R12 R19: library part R0151-A.4, "RES CHIP 0201 4K7 1% 1/20W", Case Code (Imperial)=0201, Case Code (Metric)=0603, Manufacturer=Yageo, Power=50mW, Tolerance=1%, Case/Package=0201, Code Arduino=A5521, Length=0.6mm, Part Number=RC0201FR-074K7L
SJ1: library part UT0002-A.3, "Solder Jumper 0805"
SJ2: library part UT0033-A.6, Manufacturer=Vishay, Part Number=CRCW02010000Z0ED, Code Arduino=R0140
SJ4: library part UT0006-A.10, "Solder Jumper shorted pads"
U1: library part U0177-A.10, "IC MICROCONTROLLER RASPBERRY PI", Manufacturer=Raspberry, Code Arduino=U0177, Device Type=MCU, Mount=SMT, Part Number=RP2040
U2: library part M0002-A.5, "MODULE ESP32 WiFi/BLE", Manufacturer=UBlox, Code Arduino=NINA-W102-00B, Part Number=NINA-W102-00B, Pin Count=45
U4: library part U0034-A.4, "IC AUTHENTICATION CHIP UDFN8", Manufacturer=Microchip, Code Arduino=ATECC608A-MAHDA-T, Datasheet=http://ww1.microchip.com/downloads/en/DeviceDoc/ATECC608A-CryptoAuthentication-Device-Summary-Data-Sheet-DS40001977B.pdf, Device Type=IC, Mount="Surface Mount", Packaging="Cut Tape", Part Number=ATECC608A-MAHDA-T, Pin Count=9
U5: library part U0197-A.3, "IC FLASH 128MB 6DFN 3V", Manufacturer="Adesto Technologies", Code Arduino=U0197, Part Number=AT25SF128A-MHB-T, Pin Count=8
U6: library part U0072-A.5, "IC STEP DOWN CONV 1A 22V QFN8", Manufacturer="Monolithic Power Systems", Code Arduino=U0072, Device Type="STEP DOWN CONV", Part Number=MP2322GQH, Pin Count=8
U7: library part X0013-A.3, "MEMS OSC 12MHz VDD 1.7V to 3.6V VFLGA 1.6mm x 1.2mm", Manufacturer=Microchip, Code Arduino=X0013, Part Number=DSC6111HI2B-012.0000, REACH SVHC=Yes
U8: library part U0074-A.4, "SENS MEMS AUDIO OMNIDIRECTIONAL", Manufacturer=STMicroelectronics, Code Arduino=A5470, Device Type=SENSOR, Part Number=MP34DT06JTR, Pin Count=5, RoHS Certificate="STM_RoHS letter updated 2019.pdf", RoHS Compliance=RoHS3
U9: library part U0179-A.4, "IMU ACCEL/GYRO I2C/SPI 14VFLGA", Case/Package=LGA-14L, Manufacturer=STMicroelectronics, Max Operating Temperature=+85, Max Supply Voltage=3.6V, Min Operating Temperature=-40, Min Supply Voltage=1.7V, Code Arduino=U0179, Device Type=IMU, Mount=SMT, Number of Pins=14, Part Number=LSM6DSOXTR, Pin Count=14, Sensor Type=IMU

## Free pads (board coordinates)
  round 1.651 hole 1.651 unplated: MH(1.264,1.261) MH(1.264,16.501) MH(41.904,1.261) MH(41.904,16.501)

## Via types
v1: diameter 0.4, hole 0.2, TOP to BOTTOM, tented both sides, 198 vias

## Nets (pads, with @x,y where several pads share a name; then routed paths per layer and width w, separated by ;. In a path a pad name is that pad's centre, name@x,y a point inside that pad or via, vN(x,y) a via of type N, cw(c..) or ccw(c..) an arc to the next point about the centre after c; other vN are vias at no path point)
+1V1: C10.1 C24.1 C33.2 U1.23 U1.45 U1.50 | length 21.8
  TOP w0.15: C24.1@20.137,4.044 20.608,4.044 20.723,4.16 20.723,4.643 20.904,4.824 20.904,6.019 20.932,6.047 20.932,6.239 21.004,6.312 U1.45@21.004,6.791 21.004,7.51 21.503,8.009 22.735,8.009 ; C33.2@20.137,4.614 20.152,4.599 20.723,4.599 ; C10.1@22.134,14.416 22.13,14.412 22.13,14.128 22.204,14.053 U1.23@22.204,13.541 22.204,12.866 22.316,12.754 v1(22.316,12.686) ; U1.50@23.004,6.791 23.004,7.251 22.735,7.521 22.735,8.009 ; v1(24.795,9.537) 24.795,8.639 24.489,8.333 23.06,8.333 22.735,8.009
  SIG w0.15: v1(20.234,10.883) 20.301,10.883 20.445,11.027 23.624,11.027 24.229,10.422 24.229,10.015 24.329,9.915 24.329,9.91 24.578,9.661 24.603,9.661 24.726,9.538 v1@24.814,9.538
  BOTTOM w0.15: v1(20.234,10.883) 21.311,10.883 22.316,11.888 v1(22.316,12.686)
+3V3: C5.1 C6.1 C7.1 C11.1 C12.1 C13.1 C14.1 C15.1 C16.1 C17.2 C18.1 C21.1 C26.1 C27.1 C28.1 C30.1 C32.1 DL2.A DL3.1 JP2.2 L1.2 R2.2 R7.2 R9.2 R10.2 R11.2 R12.2 R19.2 SJ4.1 TP_3V3.X U1.1 U1.10 U1.22 U1.33 U1.42 U1.44 U1.48 U1.49 U2.9 U2.10 U4.8 U5.8 U7.1 U7.4 U8.1 U8.2 U9.5 U9.8 U9.12 | length 55.4
  TOP w0.15: v1(0.494,14.541) 1.119,14.541 DL2.A@1.169,14.591 ; R2.2@5.094,3.041 5.097,3.039 5.097,2.509 JP2.2@6.344,1.261 ; DL3.1@7.481,11.493 DL3.1@7.484,11.496 7.916,11.496 8.019,11.6 8.019,12.776 v1(7.979,12.817) 7.953,12.817 7.711,13.059 C28.1@7.711,13.296 ; v1(16.624,7.378) 16.625,7.379 17.17,7.379 C26.1@17.171,7.381 U5.8@17.171,8.331 ; v1(17.895,3.976) 17.931,3.976 18.468,4.513 L1.2@18.564,4.513 ; R11.2@18.45,14.416 18.45,14.028 17.847,13.425 17.847,12.599 18.096,12.35 C21.1@18.45,12.35 18.45,11.719 18.542,11.628 v1(18.542,11.574) 18.949,11.166 U1.33@19.429,11.166 ; U1.42@19.429,7.566 19.439,7.557 20.489,7.557 v1(20.528,7.518) 20.528,7.45 20.604,7.374 U1.44@20.604,6.791 20.604,6.136 20.495,6.026 C13.1@20.495,5.721 ; v1(19.573,3.423) R9.2@20.043,3.422 ; C18.1@19.928,5.732 19.928,5.95 20.052,6.074 20.542,6.074 ; R9.2@20.044,3.422 R10.2@20.676,3.421 ; U1.48@22.204,6.791 22.204,6.233 22.39,6.048 22.604,6.048 ; U1.49@22.604,6.791 22.604,6.048 ; C11.1@22.712,14.387 22.712,14.186 22.604,14.078 U1.22@22.604,13.541 22.604,12.999 22.895,12.709 v1(22.895,12.676) ; U9.8@22.896,4.881 22.455,4.881 22.217,4.643 C6.1@21.995,4.643 ; U9.12@23.771,3.031 23.771,2.473 23.654,2.355 22.624,2.355 21.995,2.984 C32.1@21.995,3.443 C30.1@21.995,4.043 C6.1@21.995,4.643 ; v1(24.764,5.994) 24.764,5.938 24.771,5.931 U9.5@24.771,5.331 ; R12.2@25.788,14.762 26.139,14.762 26.609,15.231 28.139,15.231 28.227,15.144 U7.1@28.227,14.708 28.589,14.708 28.695,14.602 C14.1@28.989,14.602 28.988,14.203 28.844,14.059 v1(28.844,13.991) ; U1.1@26.179,7.566 26.543,7.566 26.568,7.591 26.582,7.591 26.62,7.629 27.059,7.629 27.191,7.761 v1(27.258,7.761) 27.279,7.74 27.279,7.418 C12.1@27.299,7.397 ; U1.10@26.179,11.166 26.189,11.157 26.653,11.157 26.763,11.047 27.434,11.047 C7.1@27.491,11.104 27.503,11.104 27.754,10.853 27.754,10.62 v1(27.802,10.572) ; U4.8@28.409,3.201 28.409,3.558 v1(28.76,3.909) 28.798,3.871 29.035,3.871 29.219,3.687 C27.1@29.219,3.442 ; v1(33.894,14.129) 34.418,14.653 R7.2@35.369,14.653 ; R19.2@34.313,3.442 34.316,3.44 34.316,2.96 v1(34.319,2.957) ; C6.1@21.995,4.643 C5.1@21.995,5.243 22.265,5.243 22.547,5.525 22.547,5.595 22.604,5.653 22.604,6.048
  TOP w0.2: C17.2@14.571,7.231 14.695,7.355 15.433,7.355 15.436,7.357 16.603,7.357 v1(16.624,7.378) ; U7.4@28.277,13.958 28.294,13.975 28.828,13.975 v1(28.844,13.991) ; C15.1@37.163,3.442 37.163,3.663 37.4,3.9 37.8,3.9 37.919,4.019 U2.9@37.919,4.756 ; C16.1@38.344,3.453 38.549,3.453 38.897,3.801 38.897,4.734 U2.10@38.919,4.756
  TOP w0.4: U2.9@37.919,4.756 38.069,4.906 38.069,5.594 v1(38.223,5.748) 38.419,5.748 38.769,5.397 38.769,4.906 U2.10@38.919,4.756
  BOTTOM w0.15: v1(38.223,5.748) 38.669,5.748 TP_3V3.X@39.263,6.341
  BOTTOM w0.3: v1(16.624,7.378) 16.921,7.08 SJ4.1@16.921,6.052
  BOTTOM w0.5: v1(27.258,7.761) 27.258,8.811 27.598,9.151 27.598,9.996 27.802,10.2 v1(27.802,10.572)
  other v1: 22.595,5.643 9.195,12.746 11.374,12.746
A0~: JP2.4 U1.38 | length 22.2
  TOP w0.15: v1(9.099,7.051) 9.099,7.795 9.639,8.335 9.639,9.562 10.131,10.054 11.611,10.054 12.091,10.534 12.091,11.101 v1(12.077,11.115) ; v1(18.231,8.728) 18.67,9.166 U1.38@19.429,9.166
  BOTTOM w0.15: v1(9.099,7.051) 9.606,7.051 10.181,6.476 10.181,5.692 11.409,4.463 JP2.4@11.409,1.261 ; v1(12.077,11.115) 15.663,11.115 16.88,9.899 16.88,9.109 17.233,8.756 18.202,8.756 v1(18.231,8.728)
A1~: JP2.5 U1.39 | length 21.9
  TOP w0.15: v1(9.558,7.503) 9.989,7.503 10.483,7.996 11.526,7.996 11.971,8.442 11.971,9.836 12.501,10.366 12.501,10.594 v1(12.548,10.641) ; v1(17.825,8.29) 18.394,8.29 18.871,8.766 U1.39@19.429,8.766
  BOTTOM w0.15: v1(9.558,7.503) 9.888,7.503 13.949,3.441 JP2.5@13.949,1.261 ; v1(12.548,10.641) 15.509,10.641 16.467,9.683 16.467,9.035 17.212,8.29 v1(17.825,8.29)
A2~: JP2.6 U1.40 | length 9.7
  TOP w0.15: v1(18.59,6.732) 18.59,6.799 18.438,6.951 18.438,7.909 18.895,8.366 U1.40@19.429,8.366
  BOTTOM w0.15: JP2.6@16.489,1.261 19.745,4.517 19.745,5.544 18.59,6.699 v1(18.59,6.732)
A3~: JP2.7 U1.41 | length 8.3
  TOP w0.15: v1(19.144,6.745) 19.144,6.779 18.754,7.168 18.754,7.801 18.919,7.966 U1.41@19.429,7.966
  BOTTOM w0.15: JP2.7@19.029,1.261 19.142,1.374 19.142,2.098 20.154,3.111 20.154,5.735 v1(19.144,6.745)
A4/SDA~: JP2.8 R9.1 R16.1 U1.15 U2.2 U9.14 | length 31.7
  TOP w0.15: R9.1@20.043,2.872 20.043,2.432 21.214,1.261 JP2.8@21.569,1.261 ; v1(24.671,2.231) 24.671,2.299 24.771,2.399 U9.14@24.771,3.031 U9.14@24.771,3.131 ; v1(25.406,12.519) U1.15@25.405,13.541 ; v1(30.335,3.775) 30.381,3.822 30.61,3.822 30.654,3.866 30.945,3.866 ; U2.2@30.919,4.756 30.945,4.731 30.945,3.866 ; R16.1@31.43,3.453 31.43,3.778 31.342,3.866 30.945,3.866
  SIG w0.15: JP2.8@21.569,1.261 22.87,2.562 24.671,2.562 24.671,2.55 ; v1(24.671,2.231) 24.671,2.55 ; v1(26.796,7.204) 26.796,7.9 27.182,8.286 28.271,8.286 28.624,8.639 28.907,8.639 29.344,8.639 29.719,8.264 29.719,6.066 30.335,5.45 v1(30.335,3.775) 29.945,3.775 28.758,2.588 24.709,2.588 24.671,2.55
  BOTTOM w0.15: v1(25.406,12.519) 26.101,11.823 26.101,8.892 26.783,8.21 26.783,7.217 v1(26.796,7.204)